# Altium PCB V+H.PcbDoc
Units mil, origin at the board's own origin, x right, y up, seen from the top; angles counter-clockwise.
Board outline 825 x 1250 mil, 2 copper layers (Top Layer, Bottom Layer); 27 components, 0 nets, 68 pads, 15 vias.
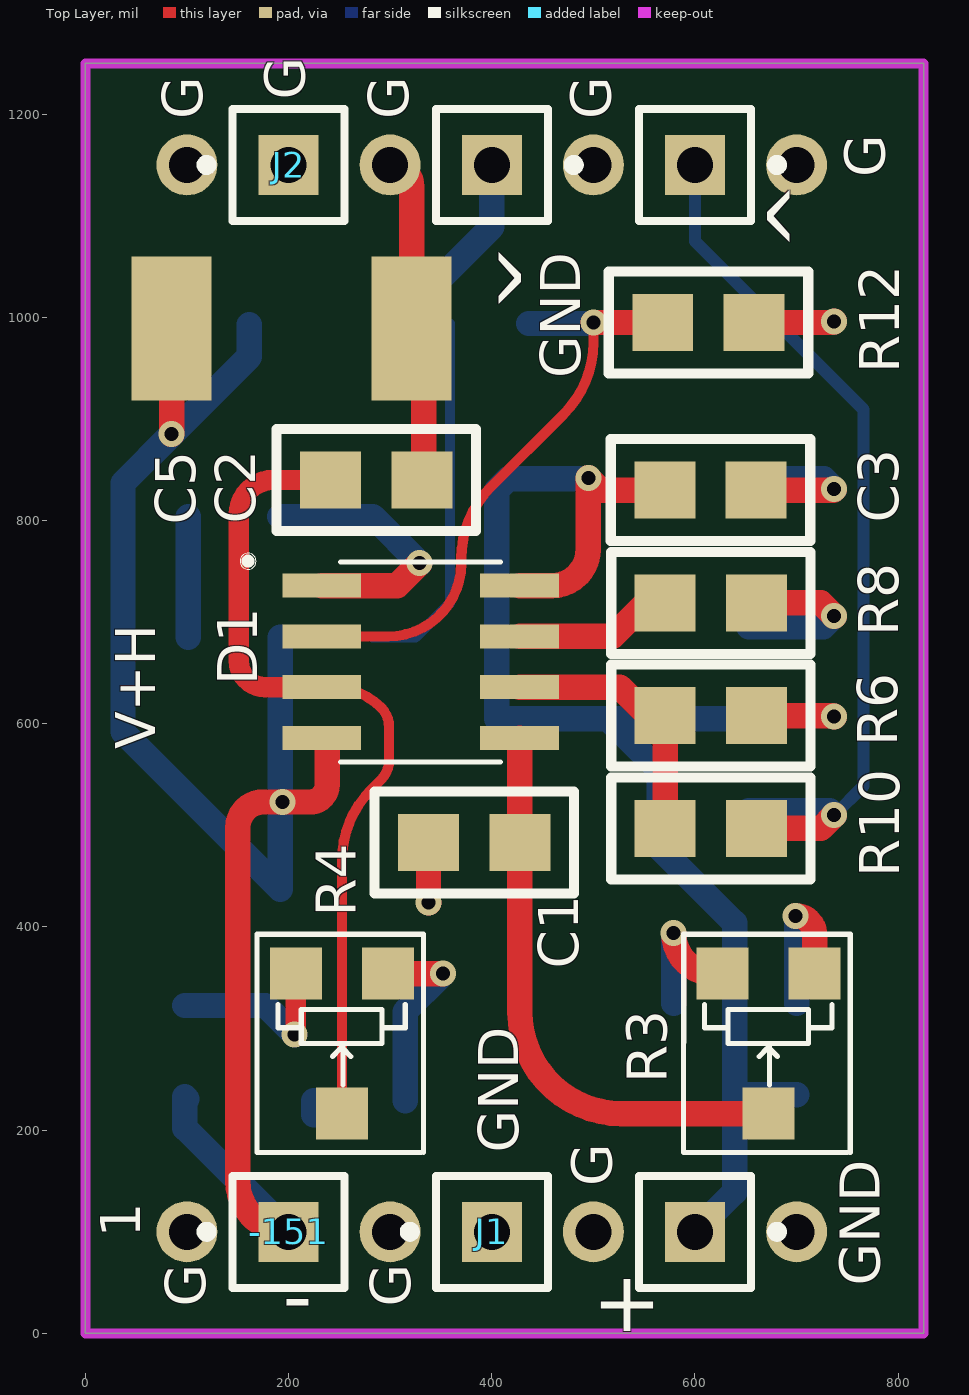
[diagram p0: Top Layer view]
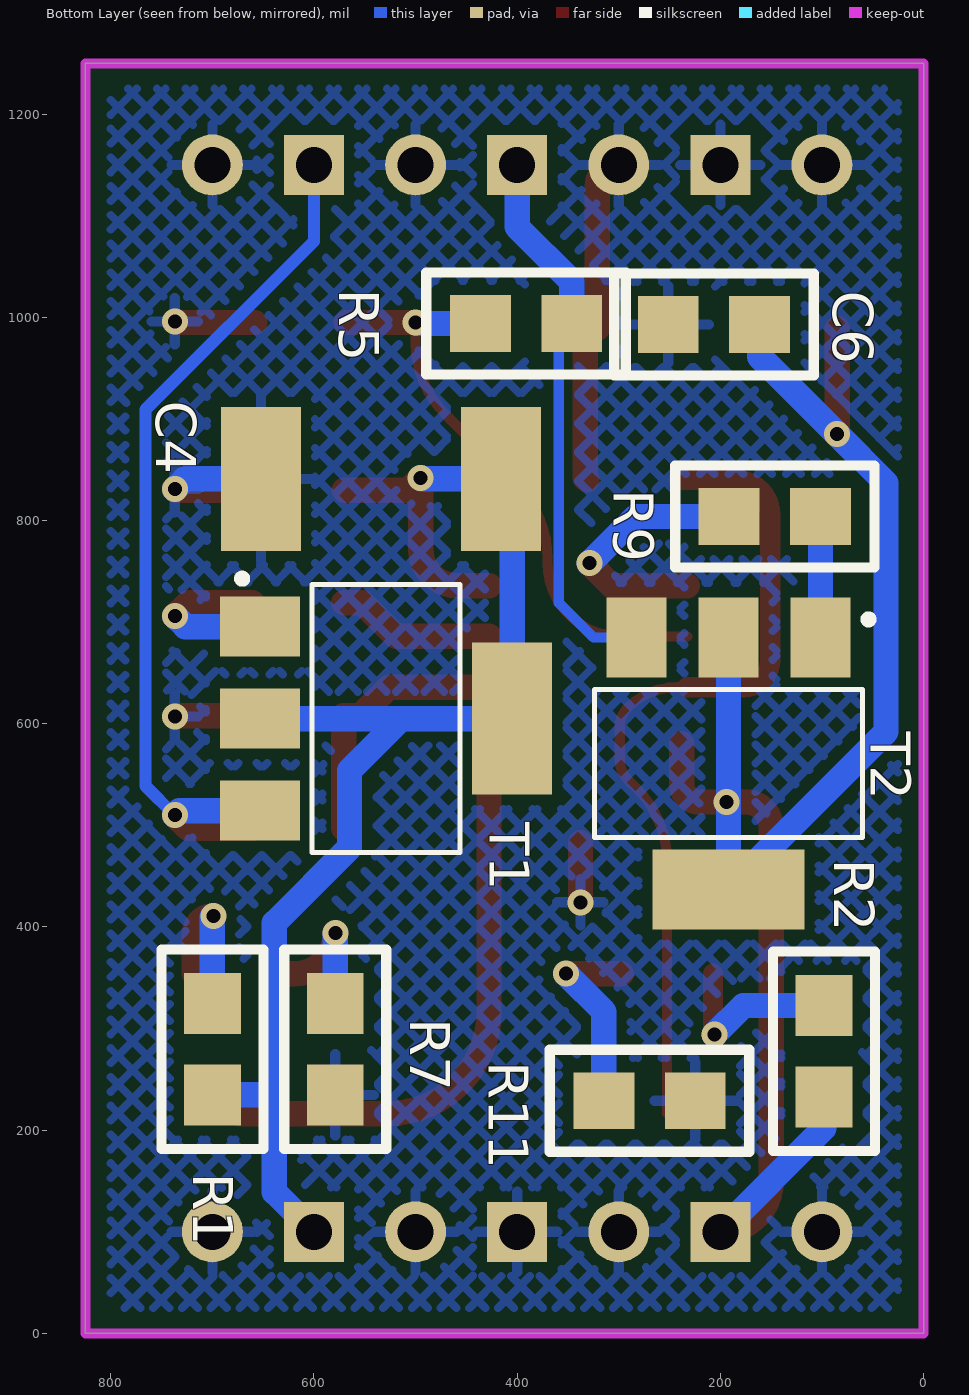
[diagram p1: Bottom Layer view, seen from below]

## Layer stack, top to bottom
Top Solder: solder mask 0.4, Solder Resist, Dk 3.5
Top Layer: signal copper 1.4
Dielectric 1: dielectric 12.6, FR-4, Dk 4.8
Bottom Layer: signal copper 1.4
Bottom Solder: solder mask 0.4, Solder Resist, Dk 3.5

## Board outline
0,0 825,0 825,1250 0,1250

## Design rules (kind name [scope] priority, off if disabled: settings)
Clearance [All] p1: gap=10
PolygonConnect [All] p1: connectstyle=Relief reliefconductorwidth=10 reliefentries=4 polygonreliefangle="90 Angle" airgapwidth=10
RoutingVias [All] p1: holewidth=28 width=50 viastyle="Through Hole" minholewidth=28 minwidth=50 maxholewidth=28 maxwidth=50
SolderMaskExpansion [All] p1: expansion=4
Width [All] p1: maxlimit=10 minlimit=10 preferedwidth=10
29 further rules are at their usual default settings.

## Components (designator, comment, footprint, x,y, rotation, side; value= is the part's Value field where it differs from the comment)
+ "" PIN1 600,100 r270 top (schematic designator +15)
-151 "-" PIN1 200,100 r90 top
^ "" PIN1 400,1150 r270 top (schematic designator V_LOW1)
^ "" PIN1 600,1150 r270 top (schematic designator V_HIGH1)
C1 "0.1" CAP_SMALL 284,433 r0 top
C2 "0.1" CAP_SMALL 385,890 r180 top
C3 "0.1" CAP_SMALL 714,880 r180 top
C4 "22" Cap_BIG 373,766 r90 bottom
C5 "22" Cap_BIG 42,1064 r270 top
C6 "0.1" CAP_SMALL 305,943 r180 bottom
D1 "LF353" SOIC127P600X175-8N 330,661 r0 top
J1 "GND" PIN1 400,100 r90 top
J2 "GND" PIN1 200,1150 r90 top
R1 "10k" RES 749,182 r180 bottom
R2 "10k" RES 147,180 r180 bottom
R3 "10k" PODSR_RES 673,282 r180 top
R4 "10k" PODSR_RES 253,282 r180 top
R5 "249" RES 489,1043 r270 bottom
R6 "1k" RES 713.42,559 r90 top
R7 "10k" RES 628,182 r180 bottom
R8 "100" RES 518,768 r270 top
R9 "100" RES 244,853 r270 bottom
R10 "249" RES 518,546 r270 top
R11 "10k" RES 172,180 r90 bottom
R12 "1k" RES 711,946 r90 top
T1 "PZT2222" SOT230P700X180-4N 529,605 r270 bottom
T2 "PZT2907" SOT230P700X180-4N 192,561 r0 bottom

## Footprints (in the part's own frame and the unit in brackets; to place one, negate y for a bottom-side part, rotate by r counter-clockwise, add the part's x,y. Pads: shape width x height; smd on the part's side, far side on the other; paste and mask are expansions set on the pad)
Cap_BIG [mm] "FROM_MAX"
  rect 3.6x2 smd: 1(1.905,7.092) 2(1.905,1.092)
  body extent 0,-0.01 3.81,8.19, height 2.54
CAP_SMALL [mil] "FROM_MAX"
  rect 60x55.98 smd: 1(53.71,50) 2(143.71,50)
  silkscreen extent 1,0 197,100, body extent 20,18 178,82, height 100
PIN1 [mm] "Connector; Plug"
  rect 1.5x1.5 hole 0.9: 1(0,0)
  silkscreen extent -1.4,-1.4 1.4,2.18
PODSR_RES [mm] "PODSR_RES"
  rect 1.3x1.3 smd: 1(-1.136,-1.83) 2(0.014,1.67) 3(1.164,-1.83)
  silkscreen extent -2.03,-2.82 2.14,2.64
RES [mil] "FROM_MAX"
  rect 55.98x60 smd: 1(49,52.71) 2(49,142.71)
  silkscreen extent -1,0 99,196, body extent 17,19 81,177, height 100
SOIC127P600X175-8N [mm]
  rect 1.97x0.6 smd: 1(-2.475,1.905) 2(-2.475,0.635) 3(-2.475,-0.635) 4(-2.475,-1.905) 5(2.475,-1.905) 6(2.475,-0.635) 7(2.475,0.635) 8(2.475,1.905)
  silkscreen extent -4.51,-2.5 2,2.71
SOT230P700X180-4N [mm]
  rect 1.5x2 smd: 1(-2.3,-3.15) 2(0,-3.15) 3(2.3,-3.15)
  rect 3.8x2 smd: 4(0,3.15)
  silkscreen extent -3.6,-3.7 3.35,1.85

## Part data
+ -151 ^ ^ J1 J2: library part Socket, "Socket"
C1 C2 C3 C6: library part CAP_SMALL
C4 C5: library part CAP_BIG
R1 R2 R5 R6 R7 R8 R9 R10 R11 R12: library part RES
R3 R4: library part RES_PODSTR
T1: library part PZT2222A
T2: library part PZT2907A

## Free pads (board coordinates)
  round 60 hole 35.43: 1(100,100) 1(100,1150) 1(300,100) 1(300,1150) 1(500,100) 1(500,1150) 1(700,100) 1(700,1150)

## Via types
v1: diameter 25.59, hole 13.78, Top Layer to Bottom Layer, 15 vias

## Nets (pads, with @x,y where several pads share a name; then routed paths per layer and width w, separated by ;. In a path a pad name is that pad's centre, name@x,y a point inside that pad or via, vN(x,y) a via of type N, cw(c..) or ccw(c..) an arc to the next point about the centre after c; other vN are vias at no path point)
pads on no net: +.1 -151.1 ^.1 C1.1 C1.2 C2.1 C2.2 C3.1 C3.2 C4.1 C4.2 C5.1 C5.2 C6.1 C6.2 D1.1 D1.2 D1.3 D1.4 D1.5 D1.6 D1.7 D1.8 J1.1 J2.1 R1.1 R1.2 R2.1 R2.2 R3.1 R3.2 R3.3 R4.1 R4.2 R4.3 R5.1 R5.2 R6.1 R6.2 R7.1 R7.2 R8.1 R8.2 R9.1 R9.2 R10.1 R10.2 R11.1 R11.2 R12.1 R12.2 T1.1 T1.2 T1.3 T1.4 T2.1 T2.2 T2.3 T2.4
copper on no net: | length 9028.2
  Top Layer w10: 232.56,636 242.72,636 cw(c242.72,567.72) 291,616 cw(c271.69,596.69) 299,596.69 299,564.31 cw(c271.69,564.31) 291.01,545.01 281.75,535.75 ccw(c352.46,465.04) 252.46,465.04 252.46,216.27 ; 232.56,686 298,686 ccw(c298,758) 370,758 370,762.58 cw(c470,762.58) 399.29,833.29 470.71,904.71 ccw(c400,975.42) 500,975.42 v1(500,995)
  Top Layer w20: v1(206,294) 207.18,295.18 207.18,354.06 ; 232.56,636 177,636 cw(c177,662) 151,662 151,806 cw(c185,806) 185,840 241.29,840
  Top Layer w25: v1(85,885) 85,989 ; 200,100 cw(c200,150) 150,150 150,498 cw(c175,498) 175,523 v1(194,523) 221,523 ccw(c221,540) 238,540 238,580.56 ; 232.56,736 307,736 v1(329,758) ; 297.73,354.06 351.94,354.06 v1(352,354) ; 300,1150 cw(c300,1128.78) 321.22,1128.78 321.22,989 ; 331.29,840 333,841.71 333,989 339,995 ; 337.71,483 v1(337.71,424.29) v1@338,424 ; 427.44,586 427.71,585.73 427.71,483 427.71,316.27 ccw(c527.71,316.27) 527.71,216.27 672.46,216.27 ; 427.44,636 526,636 554,608 571.29,608 570.71,607.42 570.71,497 ; 427.44,686 519,686 552,719 570.71,719 ; 427.44,736 459.14,736 ccw(c459.14,771.86) 495,771.86 v1(495,842) 507,830 570.29,830 ; v1(500,995) 568.29,995 ; v1(579,394) ccw(c618.94,394) 618.94,354.06 627.18,354.06 ; 658.29,995 736,995 v1(737,996) ; 660.29,830 736,830 v1(737,831) ; 660.71,497 724,497 v1(737,510) ; 660.71,608 736,608 v1(737,607) ; 660.71,719 724,719 v1(737,706) ; v1(699,411) cw(c699,392.27) 717.73,392.27 717.73,354.06
  Bottom Layer w10: 282.55,685.02 325.02,685.02 359,719 359,994
  Bottom Layer w12: 600,1150 600,1075 765.8,909.2 765.8,538.8 v1(737,510)
  Bottom Layer w25: 98,322.71 177.29,322.71 v1(206,294) ; 100,230.71 98,232.71 98,202 200,100 ; 101.29,804 101.45,803.84 101.45,685.02 ; 161.29,993 161.29,961.29 v1(85,885) 37,837 37,591.98 192,436.98 192,685.02 ; 191.29,804 283,804 v1(329,758) ; 224.71,215.29 224.71,229 ; 314.71,229 314.71,316.71 v1(352,354) ; 346.29,994 346.29,1035.29 400,1089 400,1150 ; 436.29,994 v1@499,994 ; v1(495,842) 494,841 416,841 404.98,829.98 404.98,605 514,605 ; 579,324.71 v1(579,394) ; 600,100 639,139 639,236 640.29,234.71 700,234.71 ; 639,225 639,404 565,478 565,554 514,605 ; 652.22,841 727,841 v1(737,831) ; 653.02,514.45 732.55,514.45 v1(737,510) ; 653.02,605 514,605 ; 653.02,695.55 726.55,695.55 v1(737,706) ; v1(699,411) 700,410 700,324.71

## Polygon pours and split planes (outlines as drawn)
no net on Bottom Layer "Top Layer-No Net" (hatched 45Degree grid 20 track 8, remove dead copper, pour order 14): 25,25 800,25 800,1225 25,1225 25,25

## Keep-outs
Keep-Out Layer:
  the board outline again, w10

## Silkscreen, mask and mechanical layers (free items; w line width, h text height)
Top Overlay:
  circle w10: c160,760 r1.41
  text "G" at 216,1214 h39.37 r90
  text "G" at 115,1195 h39.37 r90
  text "G" at 318,1195 h39.37 r90
  text "G" at 517,1195 h39.37 r90
  text "G" at 787,1138 h39.37 r90
  text "GND" at 487,940 h39.37 r90
  text "V+H" at 69,575 h39.37 r90
  text "G" at 518,145 h39.37 r90
  text "1" at 54,94 h39.37 r90
  text "GND" at 782,47 h39.37 r90
  text "G" at 118,26 h39.37 r90
  text "G" at 320,26 h39.37 r90